# Altium PCB KIT_ARDUINO_R00.PcbDoc
Units mm, origin at the board's own origin, x right, y up, seen from the top; angles counter-clockwise.
Board outline 90 x 120 mm, 2 copper layers (Top Layer, Bottom Layer), stack 1.671 mm thick; 26 components, 38 nets, 130 pads, 27 vias.
Unrouted connection lines stored in the file: 12.
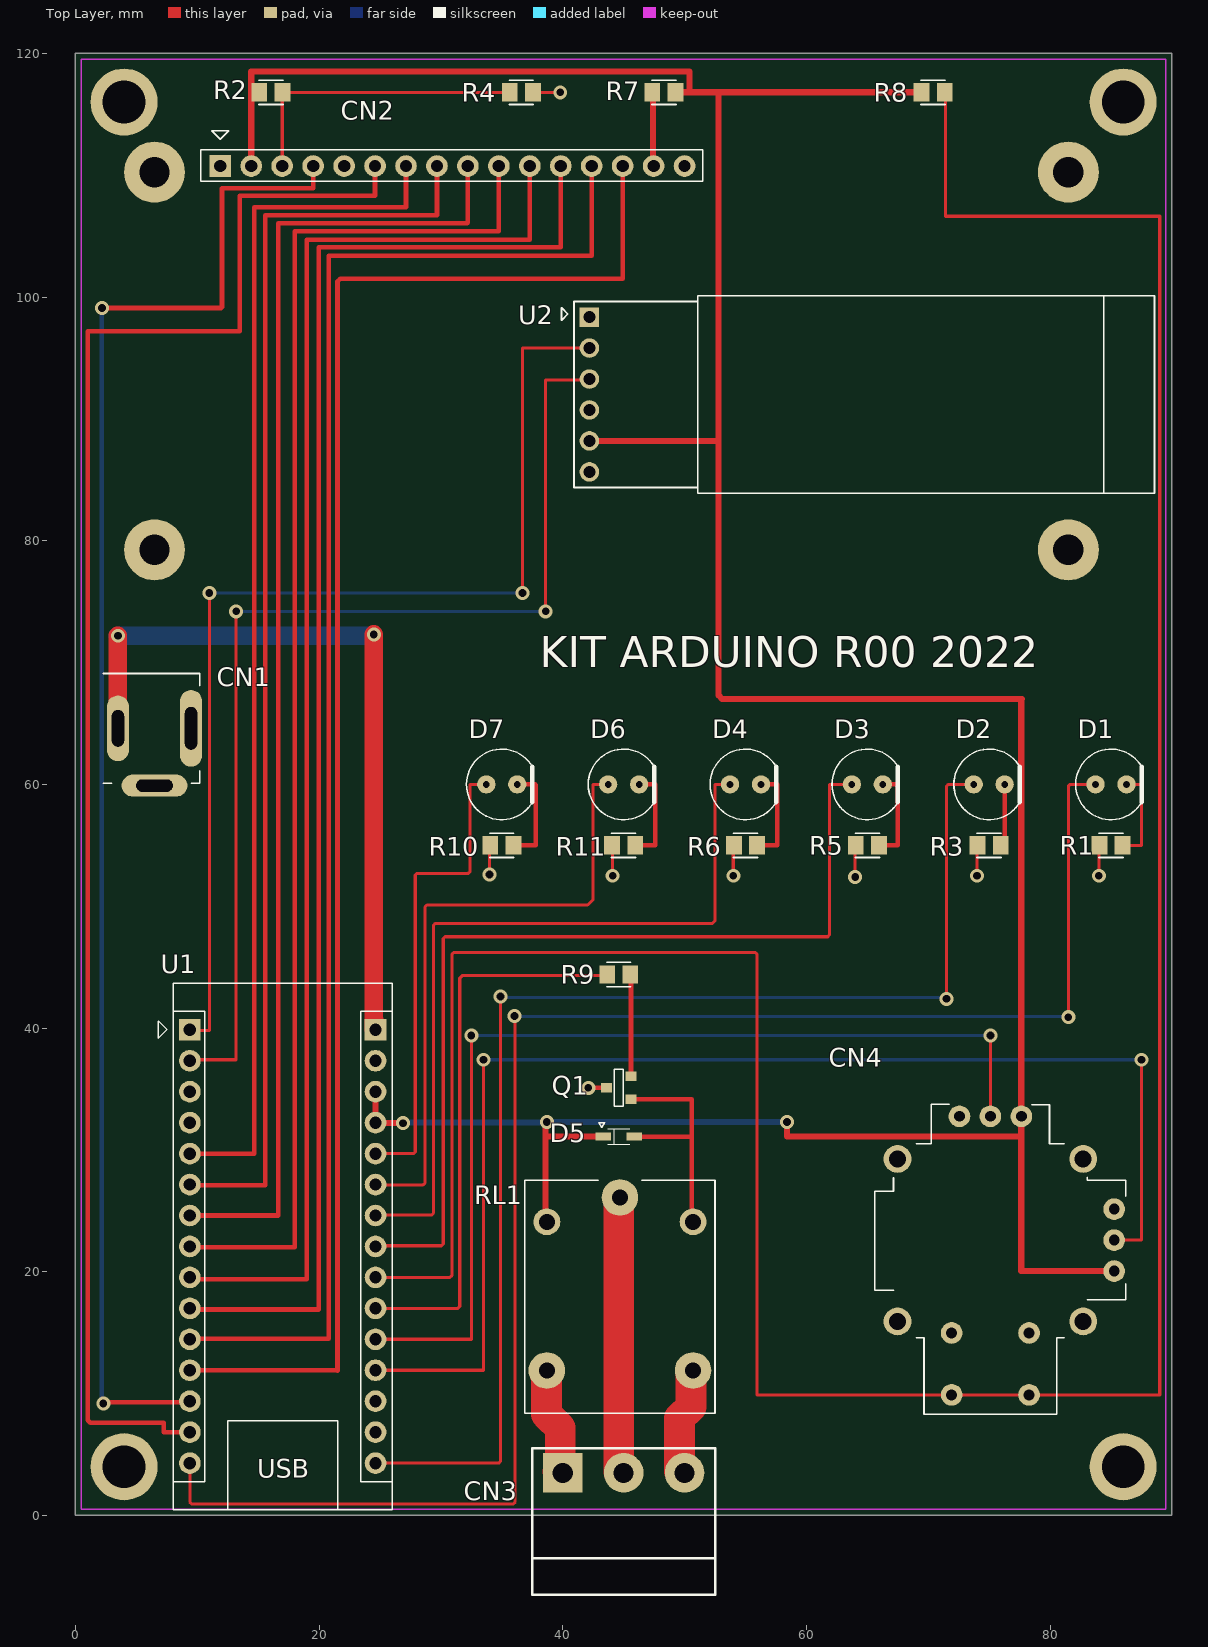
[diagram p0: Top Layer view]
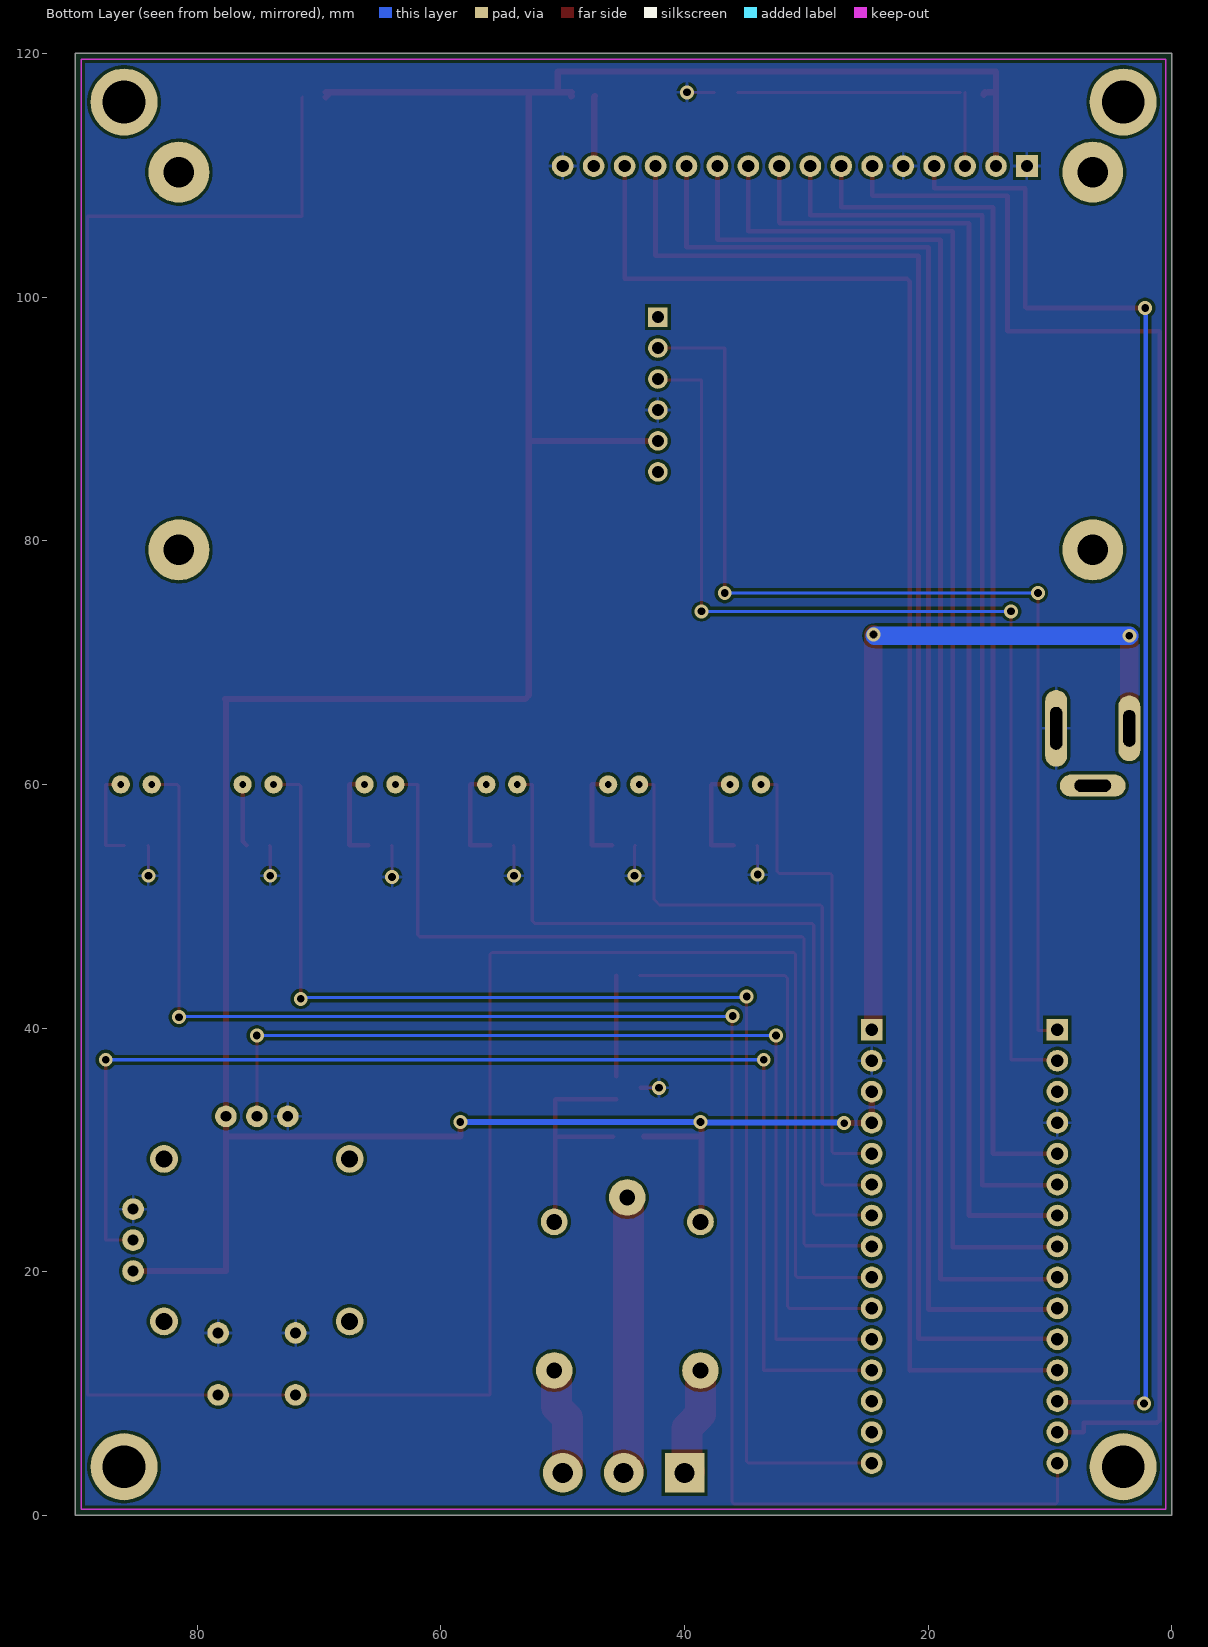
[diagram p1: Bottom Layer view, seen from below]

## Layer stack, top to bottom
Top Solder: solder mask 0.0102, Solder Resist, Dk 3.5
Top Layer: signal copper 0.0356
Dielectric 1: dielectric 1.6, FR-4, Dk 4.8
Bottom Layer: signal copper 0.0356
Bottom Solder: solder mask 0.0102, Solder Resist, Dk 3.5

## Board outline
0,0 0,120 90,120 90,0

## Design rules (kind name [scope] priority, off if disabled: settings)
Clearance [All] p1: gap=0.254 ignorepadtopadclearanceinfootprint=FALSE except(0: Arc-Hole Track-Hole SMDPad-Hole THPad-Hole Via-Hole Fill-Hole Poly-Hole Region-Hole Text-Hole)
ComponentClearance ComponentClearance_HC05 [InComponent('CN2') vs InComponent('U2')] p1: gap=0 collisioncheckmode=3 verticalgap=0 showdistances=FALSE
ComponentClearance [All] p2: gap=0.1 collisioncheckmode=3 verticalgap=0.254 showdistances=FALSE
PolygonConnect [All] p1: connectstyle=Relief reliefconductorwidth=0.254 reliefentries=4 polygonreliefangle="90 Angle" airgapwidth=0.254
RoutingVias [All] p1: holewidth=0.635 width=1.143 viastyle="Through Hole" minholewidth=0.635 minwidth=1.143 maxholewidth=0.711 maxwidth=1.27
SolderMaskExpansion [All] p1: expansion=0.102 istentingtop=FALSE
Width [All] p1: maxlimit=2.54 minlimit=0.254 preferedwidth=0.254 minimp=50.000000 maximp=50.000000 favimp=50.000000
29 further rules are at their usual default settings.

## Classes and differential pairs
component class Perifericos: CN2 CN3 CN4 D1 D2 D3 D4 D5 D6 D7 Q1 R1 R2 R3 R4 R5 R6 R7 R8 R9 R10 R11 RL1
component class CPU_ARDUINO_NANO: CN1 U1
component class COMUNICACION_Bluetooth: U2

## Components (designator, comment, footprint, x,y, rotation, side; value= is the part's Value field where it differs from the comment)
CN1 "PJ-002BH" PJ002B 9.5,64.6 r180 top
CN2 "Display_WH1602B2" WH1602B 44,95 r0 top locked
CN3 "Bornena enchufable macho 3 vias" "BORNERA-3 VIAS" 45,3.5 r0 top locked
CN4 "Joystick COM09032" "Joystick 4398" 75.1,22.6 r180 top
D1 "LED rojo" "LED 5MM" 85,60 r0 top locked
D2 "LED rojo" "LED 5MM" 75,60 r0 top locked
D3 "LED rojo" "LED 5MM" 65,60 r0 top
D4 "LED rojo" "LED 5MM" 55,60 r0 top locked
D5 "1N4148" SOD_323 44.6,31.096 r0 top
D6 "LED rojo" "LED 5MM" 45,60 r0 top locked
D7 "LED rojo" "LED 5MM" 35,60 r0 top locked
Q1 "BC817-25" SOT_23 44.6,35.096 r180 top
R1 "1K 5%" R_0805 85,55 r0 top locked
R2 "1K1" R_0805 16.05,116.8 r180 top value=1K
R3 "1K 5%" R_0805 75,55 r0 top locked value=1K
R4 "3K3" R_0805 36.6,116.8 r180 top value=1K
R5 "1K 5%" R_0805 65,55 r0 top locked value=1K
R6 "1K 5%" R_0805 55,55 r0 top locked value=1K
R7 "100R 5% 0,1W" R_0805 48.3,116.8 r180 top value=100
R8 "22K 5%" R_0805 70.4,116.8 r180 top value=22K
R9 "2K2 5%" R_0805 44.6,44.4 r0 top value=2K2
R10 "1K 5%" R_0805 35,55 r0 top locked value=1K
R11 "1K 5%" R_0805 45,55 r0 top locked value=1K
RL1 "RELE SRD" RELAY 44.7,19 r270 top locked
U1 "Header F 1x15 0,1\" ..2X" "Arduino Nano" 17.02,22.08 r0 top locked
U2 "HC05+header 1x6 F .1" "HEADER F 1x6 .1\" Horizintal" 46,92 r270 top locked

## Footprints (in the part's own frame and the unit in brackets; to place one, negate y for a bottom-side part, rotate by r counter-clockwise, add the part's x,y. Pads: shape width x height; smd on the part's side, far side on the other; paste and mask are expansions set on the pad)
"Arduino Nano" [mil]
  rect 70x70 hole 40: 1(-300,700) 30(300,700)
  round 70 hole 40: 2(-300,600) 3(-300,500) 4(-300,400) 5(-300,300) 6(-300,200) 7(-300,100) 8(-300,0) 9(-300,-100) 10(-300,-200) 11(-300,-300) 12(-300,-400) 13(-300,-500) 14(-300,-600) 15(-300,-700) 16(300,-700) 17(300,-600) 18(300,-500) 19(300,-400) 20(300,-300) 21(300,-200) 22(300,-100) 23(300,0) 24(300,100) 25(300,200) 26(300,300) 27(300,400) 28(300,500) 29(300,600)
  silkscreen extent -402,-850 354,850, body extent -358,-921 350,850, height 644
"BORNERA-3 VIAS" [mm]
  rect 3.25x3.25 hole 1.65: 1(-5,0)
  round 3.25 hole 1.65: 2(0,0) 3(5,0)
  silkscreen extent -7.5,-10 7.5,2, body extent -8.2,-10.15 7.55,1.85, height 8.75
"HEADER F 1x6 .1\" Horizintal" [mm]
  rect 1.6x1.6 hole 1: 1(-6.35,-3.81) 1(-6.35,-3.81)
  round 1.6 hole 1: 2(-3.81,-3.81) 2(-3.81,-3.81) 3(-1.27,-3.81) 3(-1.27,-3.81) 4(1.27,-3.81) 4(1.27,-3.81) 5(3.81,-3.81) 5(3.81,-3.81) 6(6.35,-3.81) 6(6.35,-3.81)
  silkscreen extent -8.1,-6.1 8.1,42.58, body extent -8,-4.03 8.1,42.8, height 6.71
"Joystick 4398" [mil]
  round 90 hole 55: 0(-300,262.5) 0(-300,-262.5) 0(300,262.5) 0(300,-262.5)
  round 70 hole 35: 1(-400,100) 2(-400,0) 3(-400,-100) 4(-100,-400) 5(0,-400) 6(100,-400)
  round 70 hole 35.43: 7(-125,500) 7(125,500) 8(-125,300) 8(125,300)
  silkscreen extent -437,-439 374,563, body extent -525,-528 525,559, height 1198
"LED 5MM" [mm]
  round 1.5 hole 0.55: 1(-1.27,0) 2(1.27,0)
  silkscreen extent -2.9,-2.9 2.51,2.9, body extent -2.98,-3.01 2.5,3.01, height 26.31
PJ002B [mm] "Power Jack 2.1mm"
  oval 1.8x6.3 hole 1 slot 3.5 at 90 deg: 1(0,0)
  oval 1.8x5.4 hole 1 slot 3 at 90 deg: 2(6,0)
  oval 5.4x1.8 hole 1 slot 3 at 0 deg: 3(3,4.7)
  silkscreen extent -0.7,-4.5 7.2,4.5, body extent -0.7,-4.7 13.7,4.7, height 11.05
R_0805 [mm]
  rect 1.3x1.5 smd: 1(-0.95,0) 2(0.95,0)
  silkscreen extent -1,-1 1,1, body extent -1.15,-0.67 1.15,0.67, height 0.76
RELAY [mm]
  round 2.2 hole 1.3: 1(-5.1,6) 2(-5.1,-6)
  round 3 hole 1.3: 3(-7.1,0) 4(7.1,6) 5(7.1,-6)
  silkscreen extent -8.5,-7.8 10.6,7.8, body extent -8.5,-7.75 10.5,7.75, height 15.3
SOD_323 [mil]
  rect 50x25 smd: 1(50,0) 2(-50,0)
  silkscreen extent -65,-25 35,45, body extent -51,-27 51,27, height 43
SOT_23 [mil]
  rect 35x31 smd: 1(-39.5,37) 2(-39.5,-37) 3(39.5,0)
  silkscreen extent -15,-60 15,60, body extent -49,-57 48,57, height 41
WH1602B [mm]
  round 5 hole 2.5 unplated: 0(-37.5,-15.75) 0(-37.5,15.25) 0(37.5,-15.75) 0(37.5,15.25)
  rect 1.778x1.778 hole 1.016: 1(-32.1,15.75)
  round 1.778 hole 1.016: 2(-29.56,15.75) 3(-27.02,15.75) 4(-24.48,15.75) 5(-21.94,15.75) 6(-19.4,15.75) 7(-16.86,15.75) 8(-14.32,15.75) 9(-11.78,15.75) 10(-9.24,15.75) 11(-6.7,15.75) 12(-4.16,15.75) 13(-1.62,15.75) 14(0.92,15.75) 15(3.46,15.75) 16(6,15.75)
  silkscreen extent -33.7,14.5 7.5,18.65, body extent -40,-18.25 40,17.9, height 20.2

## Part data
CN1: library part "Header 2", "Header, 2-Pin", LatestRevisionDate=17-Jul-2002, LatestRevisionNote="Re-released for DXP Platform.", Publisher="Altium Limited"
CN3: library part "Header 3x"
D1 D2 D3 D4 D6 D7: library part LED0, "Typical INFRARED GaAs LED", LatestRevisionDate=08-Jul-2005, LatestRevisionNote="Mech Layer 1 removed.", PackageDescription="LED; 2 Leads", PackageReference=LED-0, Published=8-Jun-2000, Publisher="Altium Limited"
D5: library part Diode, "Default Diode", Code_JEDEC=DO-214-AB, LatestRevisionDate=17-Jul-2002, LatestRevisionNote="Re-released for DXP Platform.", PackageDescription="DO-214-AB/SMC; 2 C-Bend Leads; Body 7.9 x 5.9 mm, inc. leads (LxW)", PackageReference=SMC, PackageVersion=Sep-1996, Published=8-Jun-2000, Publisher="Altium Limited"
Q1: library part NPN, "NPN Bipolar Transistor", Code_JEDEC=TO-226-AA, LatestRevisionDate=17-Jul-2002, LatestRevisionNote="Re-released for DXP Platform.", PackageDescription="TO, Flat Index; 3 In-Line, Axial Leads; Body Dia. 4.8mm; Leads 0.55 x 0.51 mm (max)", PackageReference=TO-226-AA, Published=8-Jun-2000, Publisher="Altium Limited"
R1 R2 R3 R4 R5 R6 R7 R8 R9 R10 R11: library part "Res Semi", "Semiconductor Resistor", LatestRevisionDate=17-Jul-2002, LatestRevisionNote="Re-released for DXP Platform.", PackageDescription="Axial Device, Thru-Hole; 2 Leads; 0.5 in Pin Spacing", PackageReference=AXIAL-0.5, Published=8-Jun-2000, Publisher="Altium Limited"
U1: library part "Arduino Nano", "Microcontroller"
U2: library part HC05

## Free pads (board coordinates)
  round 5.5 hole 3.5 unplated: 0(4,4) 0(4,116) 0(86,4) 0(86,116)

## Via types
v1: diameter 1.143, hole 0.635, Top Layer to Bottom Layer, 27 vias

## Nets (pads, with @x,y where several pads share a name; then routed paths per layer and width w, separated by ;. In a path a pad name is that pad's centre, name@x,y a point inside that pad or via, vN(x,y) a via of type N, cw(c..) or ccw(c..) an arc to the next point about the centre after c; other vN are vias at no path point)
+5V: CN2.2 CN4.1 CN4.4 D5.2 R2.2 R7.1 R8.2 RL1.2 U1.27 U1.28 U2.5 | length 276.7
  Top Layer w0.508: CN2.2 14.44,116.8 ; 14.44,118.46 14.44,116.8 ; 14.44,118.5 50.4,118.5 50.4,116.8 ; R2.2 14.44,116.8 ; R2.2@15.35,116.8 15.45,116.7 R2.2@15.45,116.6 ; U1.28 U1.27 24.66,32.22 26.88,32.22 v1(26.9,32.2) ; v1(38.7,32.3) 38.6,32.2 38.6,31.096 ; RL1.2@38.7,24.291 38.7,24.103 RL1.2 38.6,24.2 38.6,31.096 ; U2.5@42.19,88.19 52.739,88.19 ; D5.2 38.6,31.096 ; R7.1@49.25,116.5 R7.1@49.3,116.45 ; R7.1 50.4,116.8 ; v1(58.4,32.3) 58.4,31.1 77.54,31.1 77.64,31 ; R8.2@69.15,116.7 R8.2@69.45,116.4 ; R8.2 52.79,116.8 ; CN4.1 77.64,20.06 77.64,31 ; 50.4,116.8 52.79,116.8 ; 52.79,116.8 52.79,67.298 53.088,67 77.7,67 77.64,66.94 CN4.4 77.64,31
  Bottom Layer w0.508: v1(26.9,32.2) 26.95,32.25 38.65,32.25 v1(38.7,32.3) v1(58.4,32.3)
EJE_X: CN4.2 U1.19 | length 105.4
  Top Layer w0.254: U1.19 33.5,11.92 v1(33.5,37.4) ; CN4.2 87.5,22.6 v1(87.5,37.4)
  Bottom Layer w0.254: v1(33.5,37.4) v1(87.5,37.4)
EJE_Y: CN4.5 U1.20 | length 82
  Top Layer w0.254: U1.20 32.5,14.46 v1(32.5,39.4) ; CN4.5 v1(75.1,39.4)
  Bottom Layer w0.254: v1(32.5,39.4) v1(75.1,39.4)
GND: CN1.1 CN2.1 CN2.5 CN2.16 CN4.3 CN4.6 CN4.8 Q1.3 R1.1 R3.1 R4.1 R5.1 R6.1 R10.1 R11.1 U1.4 U1.29 U2.4 | length 19
  Top Layer w0.254: v1(34,52.6) 34,54.95 R10.1 ; R4.1 v1(39.8,116.8) ; R11.1 44.1,54.95 v1(44.1,52.5) ; v1(54,52.5) 54,54.95 R6.1 ; v1(64,52.4) 64,54.95 R5.1 ; CN4.6@72.49,32.83 CN4.6 ; v1(74,52.5) 74,54.95 R3.1 ; v1(84,52.5) 84,54.95 R1.1
  Top Layer w0.381: v1(42.1,35.096) Q1.3
LCD_DB0: CN2.7 U1.5 | length 99
  Top Layer w0.381: U1.5@9.079,29.7 U1.5 14.68,29.7 14.68,107.38 27.055,107.38 ; 27.14,107.38 CN2.7
LCD_DB1: CN2.8 U1.6 | length 104.1
  Top Layer w0.381: U1.6@9.26,27.1 15.58,27.1 15.58,106.7 29.68,106.7 CN2.8
LCD_DB2: CN2.9 U1.7 | length 108.9
  Top Layer w0.381: U1.7 16.66,24.62 16.66,106.06 32.175,106.06 ; 32.22,106.105 CN2.9
LCD_DB3: CN2.10 U1.8 | length 114.5
  Top Layer w0.381: U1.8@8.976,22 18,22 18,105.4 34.76,105.4 CN2.10
LCD_DB4: CN2.11 U1.9 | length 119.7
  Top Layer w0.381: U1.9@8.972,19.4 19,19.4 19,104.71 37.3,104.71 CN2.11
LCD_DB5: CN2.12 U1.10 | length 124.5
  Top Layer w0.381: U1.10@9.145,16.9 19.975,16.9 19.975,104.075 ; 20,104.075 39.84,104.075 CN2.12
LCD_DB6: CN2.13 U1.11 | length 129.4
  Top Layer w0.381: U1.11@9.245,14.5 20.8,14.5 20.8,103.4 42.38,103.4 CN2.13
LCD_DB7: CN2.14 U1.12 | length 134.2
  Top Layer w0.381: U1.12 21.52,11.92 ; 21.52,11.9 21.52,11.92 ; CN2.14 44.92,101.494 21.743,101.494 21.52,101.271 21.52,11.92
LCD_E: CN2.6 U1.14 | length 135.8
  Top Layer w0.381: U1.14 7.26,6.84 7.248,6.852 7.248,7.6 1.231,7.6 1.008,7.823 1.008,97.2 13.5,97.2 13.5,108.3 24.6,108.3 CN2.6
LCD_RS: CN2.4 U1.13 | length 125.7
  Top Layer w0.381: v1(2.2,99.1) 11.97,99.1 12.035,99.165 12.035,108.935 19.5,108.935 ; v1(2.3,9.2) 2.39,9.29 9.079,9.29 U1.13@9.089,9.3 ; 19.52,108.935 CN2.4
  Bottom Layer w0.381: v1(2.2,99.1) 2.155,99.055 2.155,9.344 v1(2.3,9.2)
LED1: D1.1 U1.15 | length 136.7
  Top Layer w0.254: U1.15 9.4,1.093 9.549,0.944 35.951,0.944 36.1,1.093 36.1,40.953 v1(36.053,41) ; v1(81.5,40.9) 81.5,59.851 81.649,60 D1.1
  Bottom Layer w0.254: v1(36.053,41) 36.103,40.95 81.45,40.95 v1(81.5,40.9)
LED2: D2.1 U1.16 | length 104.9
  Top Layer w0.254: U1.16 34.751,4.3 34.9,4.449 v1(34.9,42.6) ; v1(71.5,42.4) 71.5,59.851 71.649,60 D2.1
  Bottom Layer w0.254: v1(34.9,42.6) 35,42.5 71.4,42.5 v1(71.5,42.4)
LED3: D3.1 U1.23 | length 76.7
  Top Layer w0.254: U1.23 24.7,22.14 30.051,22.14 30.2,22.289 30.2,47.351 30.349,47.5 61.751,47.5 61.9,47.649 61.9,60 D3.1
LED4: D4.1 U1.24 | length 64.1
  Top Layer w0.254: U1.24 24.68,24.66 29.251,24.66 29.4,24.809 29.4,48.451 29.549,48.6 52.3,48.6 52.5,48.8 52.5,60 ; 52.6,60 D4.1
LED5: D7.1 U1.26 | length 39.1
  Top Layer w0.254: U1.26 27.751,29.7 27.9,29.849 27.9,52.551 28.049,52.7 32.251,52.7 32.4,52.849 32.4,60 D7.1
LED6: D6.1 U1.25 | length 51.5
  Top Layer w0.254: U1.25 24.67,27.13 28.551,27.13 28.7,27.279 28.7,49.951 28.849,50.1 42.051,50.1 42.5,50.549 42.5,60 D6.1
NetCN2_3: CN2.3 R2.1 R4.2 | length 24.4
  Top Layer w0.254: CN2.3 16.98,116.78 R2.1 ; R2.1@17.35,116.8 R4.2
NetCN2_15: CN2.15 R7.2 | length 5.8
  Top Layer w0.508: R7.2@47.35,116.5 47.405,116.445 47.405,110.805 CN2.15
NetCN3_1: CN3.1 RL1.5 | length 8.5
  Top Layer w2.54: RL1.5@38.6,11.496 38.688,11.408 38.688,8.308 39.8,7.196 39.8,3.796 CN3.1@39.6,3.596
NetCN3_2: CN3.2 RL1.3 | length 22.1
  Top Layer w2.54: CN3.2@44.6,3.596 RL1.3@44.6,25.696
NetCN3_3: CN3.3 RL1.4 | length 8.3
  Top Layer w2.54: CN3.3@49.6,3.596 49.6,7.996 50.512,8.908 50.512,11.408 RL1.4@50.6,11.496
NetD1_2: D1.2 R1.2 | length 7.8
  Top Layer w0.254: R1.2 87.5,55 87.5,60 D1.2
NetD2_2: D2.2 R3.2 | length 5.1
  Top Layer w0.381: R3.2 76.27,55.32 D2.2
NetD3_2: D3.2 R5.2 | length 7.8
  Top Layer w0.381: R5.2 67.5,55 67.5,60 D3.2
NetD4_2: D4.2 R6.2 | length 8
  Top Layer w0.381: R6.2 57.6,55 57.6,60 D4.2
NetD5_1: D5.1 Q1.1 RL1.1 | length 20.2
  Top Layer w0.381: Q1.1 50.6,34.156 50.6,31.096 ; D5.1 50.6,31.096 ; RL1.1@50.6,23.696 50.6,31.096
NetD6_2: D6.2 R11.2 | length 8
  Top Layer w0.381: R11.2 47.6,55 47.6,60 D6.2
NetD7_2: D7.2 R10.2 | length 8.4
  Top Layer w0.381: R10.2 37.8,55 37.8,59.953 37.753,60 D7.2
NetQ1_2: Q1.2 R9.2 | length 8.3
  Top Layer w0.381: Q1.2 R9.2@45.603,44.3
RELE: R9.1 U1.21 | length 46.2
  Top Layer w0.254: U1.21 31.399,17 31.548,17.149 31.548,44.099 31.749,44.3 R9.1@43.695,44.3
RxD: U1.1 U2.2 | length 88.9
  Top Layer w0.254: U1.1@9.384,39.8 11,39.8 v1(11,75.7) ; v1(36.7,75.7) 36.7,95.8 42.18,95.8 U2.2@42.19,95.81
  Bottom Layer w0.254: v1(11,75.7) v1(36.7,75.7) ; U2.2@42.135,95.755 U2.2@42.19,95.81
SWITCH: CN4.7 R8.1 U1.22 | length 251.2
  Top Layer w0.254: U1.22 30.751,19.54 30.9,19.689 30.9,46.051 31.049,46.2 55.811,46.2 55.96,46.051 55.96,9.9 71.925,9.9 78.275,9.9 89,9.9 89,106.63 71.4,106.63 ; R8.1@71.35,116.4 71.4,116.35 71.4,106.63
TxD: U1.2 U2.3 | length 88.8
  Top Layer w0.254: U1.2@9.251,37.4 13.2,37.4 v1(13.2,74.2) ; v1(38.6,74.2) 38.6,93.2 42.12,93.2 U2.3@42.19,93.27
  Bottom Layer w0.254: v1(13.2,74.2) v1(38.6,74.2) ; U2.3@42.155,93.235 U2.3@42.19,93.27
VIN: CN1.2 U1.30 | length 60.9
  Top Layer w1.524: CN1.2 v1(3.5,72.2) ; v1(24.5,72.3) 24.5,40.7 24.513,40.687 U1.30@24.513,39.888
  Bottom Layer w1.524: v1(3.5,72.2) v1@24.4,72.2
pads on no net: CN1.3 CN2.0 CN4.0 U1.3 U1.17 U1.18 U2.1 U2.6

## Polygon pours and split planes (outlines as drawn)
GND on Bottom Layer "GND" (solid, pour order 0): 0.5,119.5 0.5,0.5 89.5,0.5 89.5,119.5

## Keep-outs
Keep-Out Layer:
  lines w0.127: 0.5,0.5 0.5,119.5 89.5,119.5 89.5,0.5 0.5,0.5

## Silkscreen, mask and mechanical layers (free items; w line width, h text height)
Top Overlay:
  text "KIT ARDUINO R00 2022" at 38.108,69.608 h2.54
Mechanical 1:
  the board outline again, w0.127
Mechanical 5:
  circle w0.254: c86,4 r1.6
  circle w0.254: c86,116 r1.6
  circle w0.254: c4,116 r1.6
  circle w0.254: c4,4 r1.6

## Dimensions
0,-0.1 to -0.2,59.9 on Mechanical 5
0,120 to -0.2,69.3 on Mechanical 5
-0.2,69.3 to -0.2,59.9 on Mechanical 5
90,0 to 52.5,5.5 on Mechanical 5
0,0 to 36.7,-0.1 on Mechanical 5
36.7,-0.1 to 52.5,5.5 on Mechanical 5
86,4 to 86,116 on Mechanical 5
4,116 to 0,120 on Mechanical 5
4,116 to 0,120 on Mechanical 5
86,4 to 90,0 on Mechanical 5
86,4 to 90,0 on Mechanical 5
86,116 to 90,120 on Mechanical 5
86,116 to 90,120 on Mechanical 5
4,4 to 0,0 on Mechanical 5
4,4 to 0,0 on Mechanical 5
86,4 to 92.705,-2.705 on Mechanical 5
86,116 to 94.078,124.078 on Mechanical 5
4,116 to -7.5,127.5 on Mechanical 5
4,4 to -5.488,-5.488 on Mechanical 5
0,0 to 0,120 on Mechanical 5
90,0 to 0,0 on Mechanical 5

## Text inside footprints (layer, text, board x,y; h text height)
U1: Top Overlay "USB" at 14.92,3.08 h1.52